# Altium PCB MainBoardPCB.PcbDoc (part 19 of 50)
Units mm, origin at the board's own origin, x right, y up, seen from the top; angles counter-clockwise.
Board outline 258.95 x 308.86 mm, 16 copper layers (L1, L2 (GND), L3 (Sign), L4 (GND), L5 (Sign), L6 (PWR/GND), L7(12V+Other), L8 (Plane_GND), L9 (PWR/GND), L10 (3V3+Other), L11 (PWR/GND), L12 (Sign), L13 (GND), L14 (Sign), L15 (GND), L16), stack 2.503 mm thick; 2578 components, 1867 nets, 8817 pads, 8021 vias.
Unrouted connection lines stored in the file: 25.
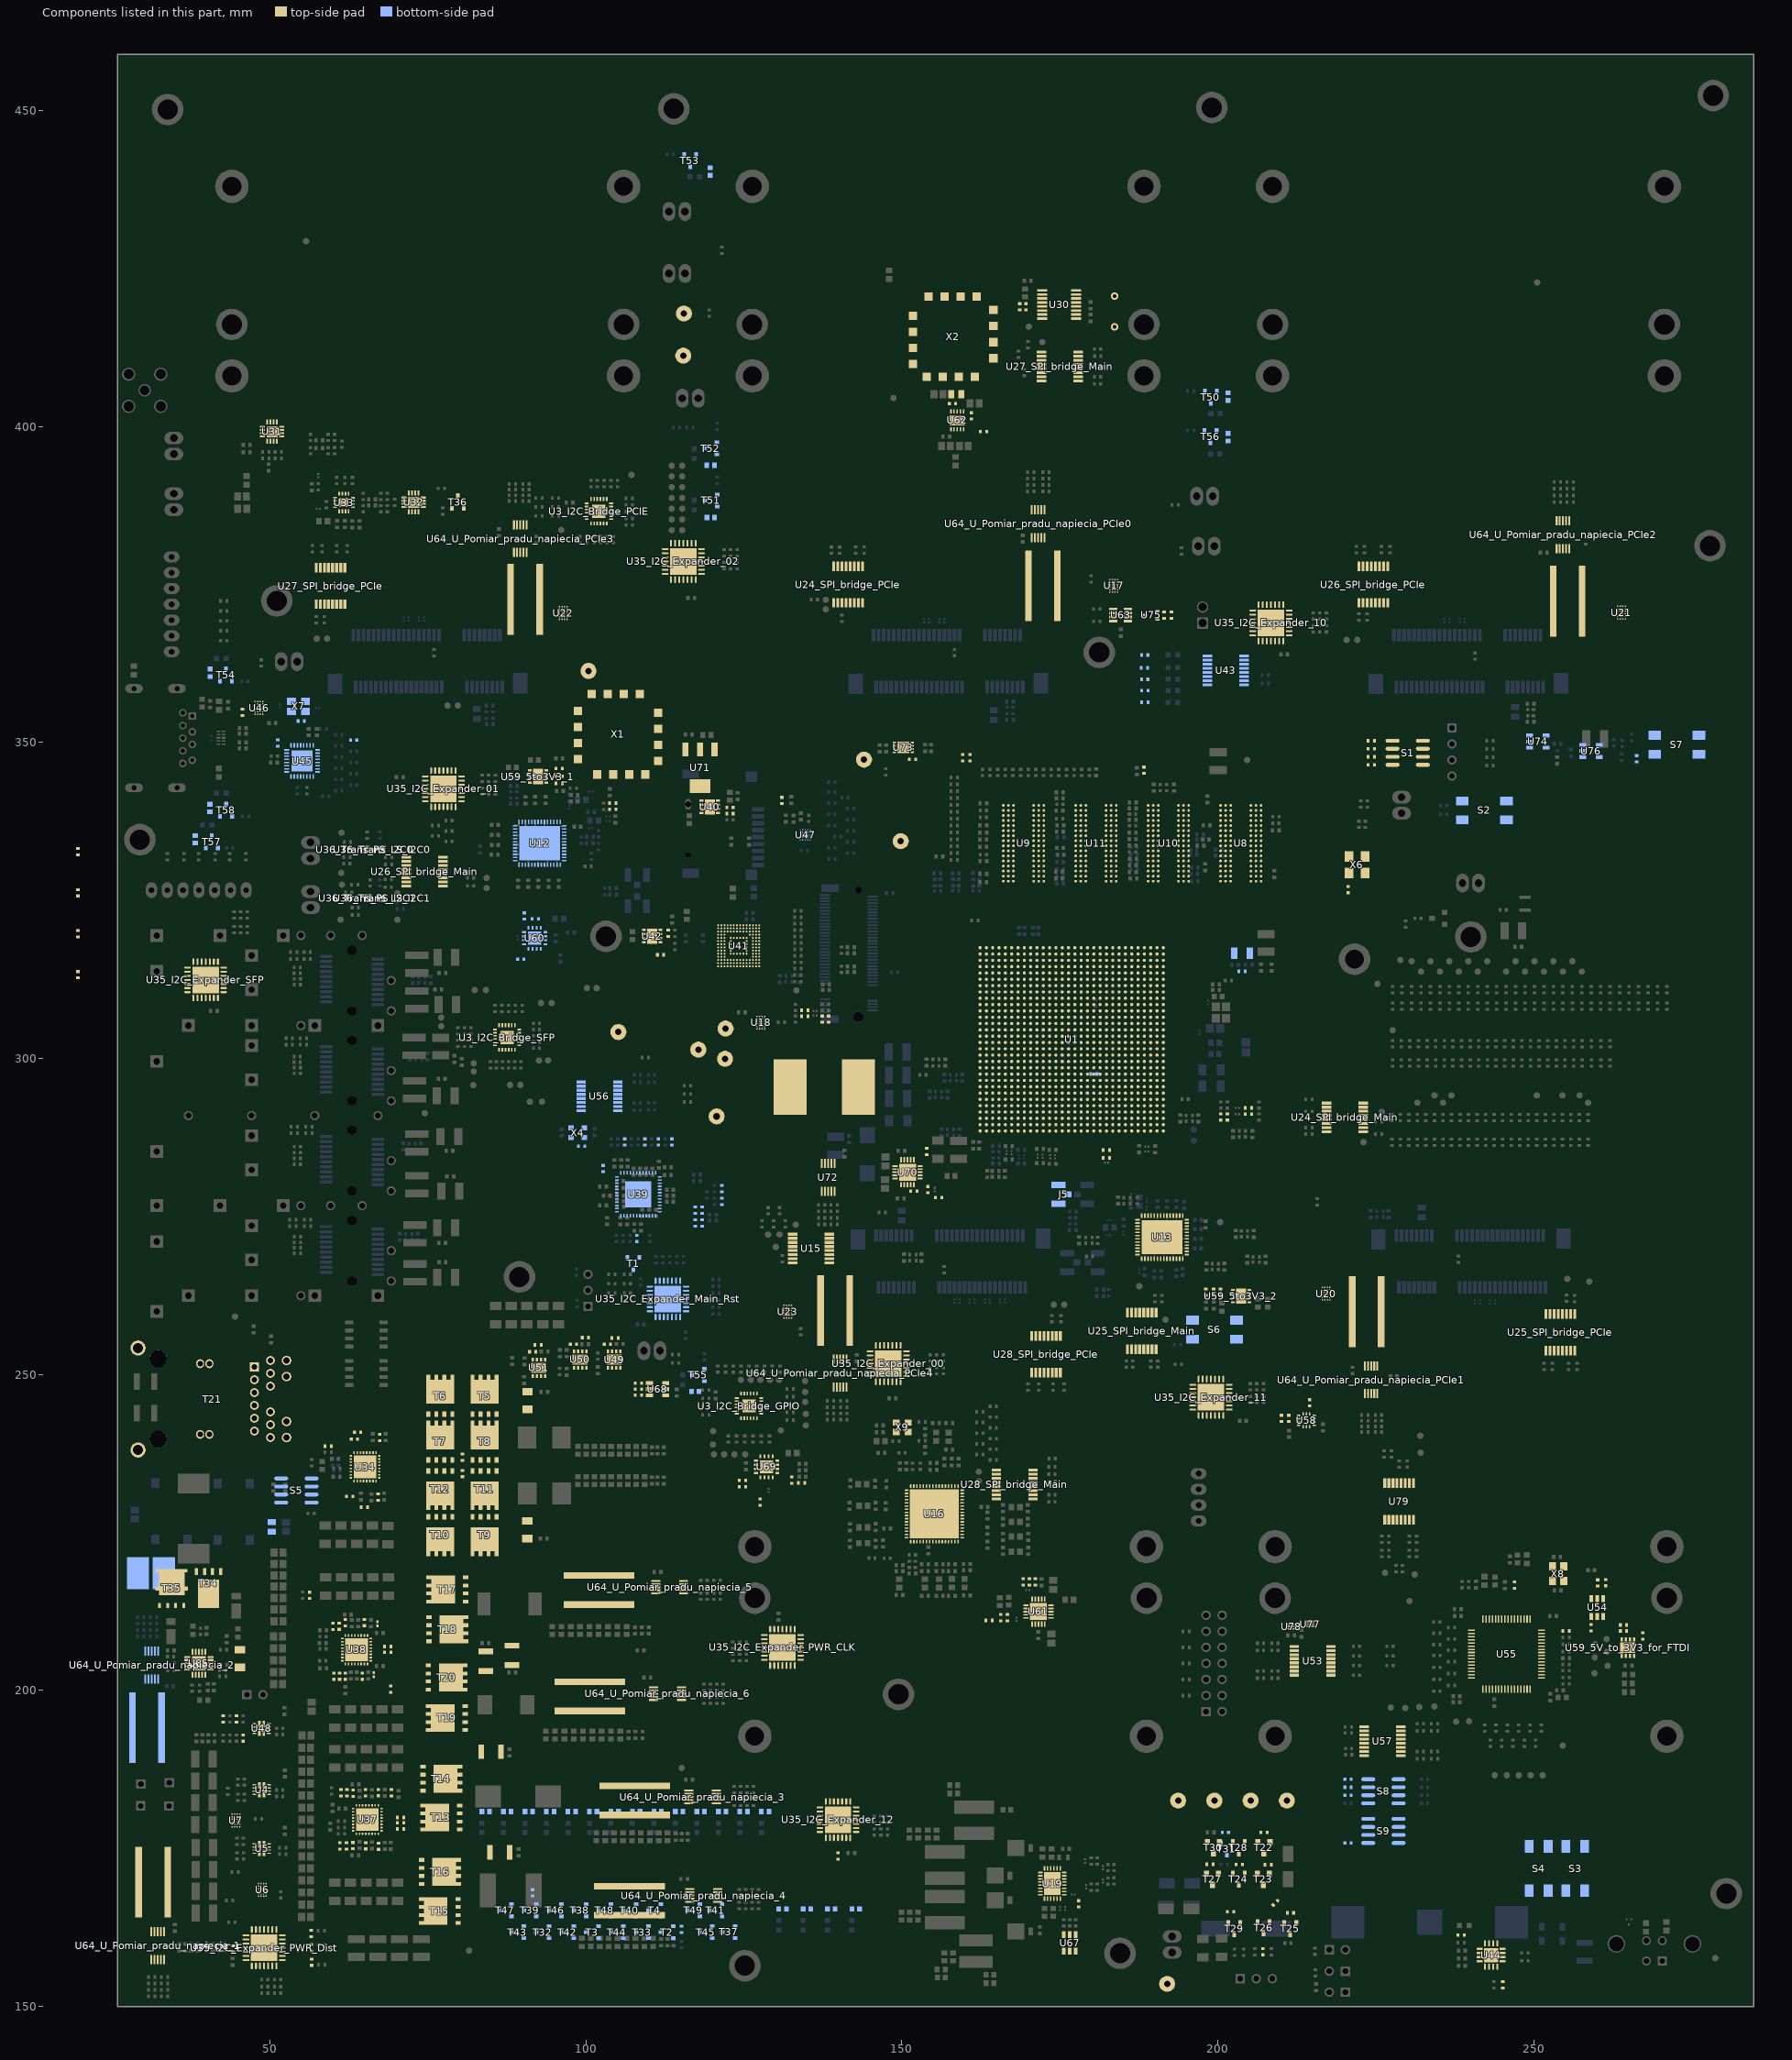
[diagram p23: the components of this part, seen from the top]

## Part data (continued)
U60 U69: "IC REG LIN POS ADJ 2A 16LFCSP", Case/Package="LFCSP EP", Dropout Voltage=160mV, Manufacturer="Analog Devices", Max Input Voltage=3.6V, Max Operating Temperature=125°C, Max Output Current=2A, Max Output Voltage=3V, Max Supply Current=1.8mA, Min Current Limit=2.4A, Min Input Voltage=1.6V, Min Operating Temperature=-40°C, Min Output Voltage=750mV, Output Voltage Accuracy=1%, Power Supply Rejection Ratio (PSRR)=70dB, Supplier Part Number 1=ADP1741ACPZ-R7CT-ND, Accuracy=1%, ComponentLink1Description=https://datasheet.ciiva.com/2041/adp1740-1741-2041344.pdf?src-supplier=Digi-Key, ComponentLink1URL=https://datasheet.ciiva.com/2041/adp1740-1741-2041344.pdf?src-supplier=Digi-Key, ComponentLink2Description=https://datasheet.ciiva.com/15364/adp1740-1741-259394-15364336.pdf?src-supplier=Mouser, ComponentLink2URL=https://datasheet.ciiva.com/15364/adp1740-1741-259394-15364336.pdf?src-supplier=Mouser, ComponentLink3Description=https://datasheet.ciiva.com/23604/697190-23604608.pdf?src-supplier=Newark, ComponentLink3URL=https://datasheet.ciiva.com/23604/697190-23604608.pdf?src-supplier=Newark, ComponentLink4Description=https://datasheet.ciiva.com/2041/adp1740-1741-2041345.pdf?src-supplier=Digi-Key, ComponentLink4URL=https://datasheet.ciiva.com/2041/adp1740-1741-2041345.pdf?src-supplier=Digi-Key, ComponentLink5Description=https://datasheet.ciiva.com/3224/adp1740-1741-3224694.pdf?src-supplier=Avnet, ComponentLink5URL=https://datasheet.ciiva.com/3224/adp1740-1741-3224694.pdf?src-supplier=Avnet, ComponentLink6Description=https://datasheet.ciiva.com/17365/adp1740-1741-17365261.pdf?src-supplier=Avnet+Europe, ComponentLink6URL=https://datasheet.ciiva.com/17365/adp1740-1741-17365261.pdf?src-supplier=Avnet+Europe, ComponentLink7Description=https://datasheet.ciiva.com/2041/adp1740-1741-2041343.pdf?src-supplier=Digi-Key, ComponentLink7URL=https://datasheet.ciiva.com/2041/adp1740-1741-2041343.pdf?src-supplier=Digi-Key, Lead Free="Contains Lead", Manufacturer Part Number=ADP1741ACPZ-R7, Number of Outputs=1, Number of Pins=16, Number of Regulators=1, Operating Supply Current=1.8mA, Output Current=2A, Output Type=Adjustable, Output Voltage=3V, Packaging="Tape and Reel", Polarity=Positive, Pricing 1="1 = 3,42000, 10 = 3,07000, 25 = 2,90240, 100 = 2,51540, 250 = 2,38644, 500 = 2,14136 (USD)", Radiation Hardening=No, REACH SVHC="No SVHC", RoHS=Yes, Stock 1=7057, Supplier 1=Digi-Key
U61 U70: "IC REG LINEAR POS ADJ 1A 20QFN", Case/Package=QFN, Dropout Voltage=130mV, Manufacturer="Texas Instruments", Max Operating Temperature=125°C, Min Current Limit=1.5A, Min Operating Temperature=-40°C, Output Current=1A, Output Voltage=5V, Quiescent Current=2mA, Supplier Part Number 1=296-43312-1-ND, Category="Voltage References", ComponentLink1Description=http://www.ti.com/lit/gpn/tps7a88?src-supplier=Mouser, ComponentLink1URL=http://www.ti.com/lit/gpn/tps7a88?src-supplier=Mouser, ComponentLink2Description=http://www.ti.com/lit/ds/symlink/tps7a88.pdf?src-supplier=Digi-Key, ComponentLink2URL=http://www.ti.com/lit/ds/symlink/tps7a88.pdf?src-supplier=Digi-Key, ComponentLink3Description=http://www.ti.com/general/docs/lit/getliterature.tsp?genericPartNumber=TPS7A88&amp;&amp;fileType=pdf&src-supplier=Farnell, ComponentLink3URL=http://www.ti.com/general/docs/lit/getliterature.tsp?genericPartNumber=TPS7A88&amp;&amp;fileType=pdf&src-supplier=Farnell, Lead Free="Lead Free", Manufacturer Part Number=TPS7A8801RTJT, Mount="Surface Mount", Number of Outputs=2, Number of Pins=20, Number of Regulators=2, Packaging="Tape and Reel", Pricing 1="1=2,77000, 10=2,48700, 25=2,34600, 100=1,87670 (USD)", RoHS=Yes, Stock 1=1455, Supplier 1=Digi-Key
U62: "LINEAR TECHNOLOGY         LT3042EDD#PBF             LDO Voltage Regulator, Adjustable, 1.8V to 20V in, 350mV drop, 0V to 15V/0.2A out, DFN-10", Case/Package=DFN, Dropout Voltage=350mV, Manufacturer="Analog Devices / Linear Technology", Max Input Voltage=20V, Max Operating Temperature=125°C, Max Output Voltage=15V, Min Current Limit=220mA, Min Input Voltage=1.8V, Min Operating Temperature=-40°C, Min Output Voltage=0uV, Output Current=200mA, Supplier Part Number 1=LT3042EDD#PBF-ND, Category="Voltage Regulators - Linear", ComponentLink1Description=http://www.farnell.com/datasheets/1941078.pdf?src-supplier=Farnell, ComponentLink1URL=http://www.farnell.com/datasheets/1941078.pdf?src-supplier=Farnell, ComponentLink2Description=http://www.linear.com/docs/55649?src-supplier=Digi-Key, ComponentLink2URL=http://www.linear.com/docs/55649?src-supplier=Digi-Key, ComponentLink3Description=http://www.farnell.com/datasheets/1941078.pdf?src-supplier=Element14, ComponentLink3URL=http://www.farnell.com/datasheets/1941078.pdf?src-supplier=Element14, Manufacturer Part Number=LT3042EDD#PBF, Mount="Surface Mount", Number of Pins=10, Number of Regulators=1, Output Type=Adjustable, Output Voltage=15V, Packaging=Rail/Tube, Pricing 1="1=5,46000, 25=3,62360, 100=2,99600 (USD)", REACH SVHC="No SVHC", RoHS=Yes, Stock 1=15977, Supplier 1=Digi-Key
U63: "IC TXRX CAN 1MBPS SOT23-8", Case/Package=SOT-23-8, Manufacturer=Maxim, Max Operating Temperature=85°C, Max Supply Current=70mA, Max Supply Voltage=3.465V, Min Operating Temperature=-40°C, Min Supply Voltage=3.135V, Operating Supply Current=35mA, Operating Supply Voltage=3.3V, Package Quantity=1, Supplier Part Number 1=MAX3051EKA+TCT-ND, Category="Interface ICs", ComponentLink1Description=https://datasheet.ciiva.com/1711/max3051-1711845.pdf?src-supplier=Digi-Key, ComponentLink1URL=https://datasheet.ciiva.com/1711/max3051-1711845.pdf?src-supplier=Digi-Key, ComponentLink2Description=https://datasheet.ciiva.com/1711/max3051-1711846.pdf?src-supplier=Digi-Key, ComponentLink2URL=https://datasheet.ciiva.com/1711/max3051-1711846.pdf?src-supplier=Digi-Key, ComponentLink3Description=https://datasheet.ciiva.com/1711/max3051-1711847.pdf?src-supplier=Digi-Key, ComponentLink3URL=https://datasheet.ciiva.com/1711/max3051-1711847.pdf?src-supplier=Digi-Key, ComponentLink4Description=https://datasheet.ciiva.com/16639/max3051-16639464.pdf?src-supplier=Avnet+Europe, ComponentLink4URL=https://datasheet.ciiva.com/16639/max3051-16639464.pdf?src-supplier=Avnet+Europe, ComponentLink5Description=https://datasheet.ciiva.com/12072/max3051-74908-12072588.pdf?src-supplier=Mouser, ComponentLink5URL=https://datasheet.ciiva.com/12072/max3051-74908-12072588.pdf?src-supplier=Mouser, Contact Plating=Tin,Matte, Data Rate=1Mbps, Height=1.25mm, Interface=CAN, Length=2.9mm, Manufacturer Part Number=MAX3051EKA+T, Mount="Surface Mount", Number of Pins=8, Number of Receive Buffers=1, Number of Transceivers=1, Number of Transmit Buffers=1, Packaging="Tape and Reel", Pricing 1="1=2,27000, 10=2,04000, 25=1,92800, 100=1,58540, 250=1,58208 (USD)", Radiation Hardening=No, REACH SVHC=Unknown, RoHS=Yes, Stock 1=2708, Supplier 1=Digi-Key, Weight=0.01787oz, Width=1.625mm
U64_U_Pomiar_pradu_napiecia_1 U64_U_Pomiar_pradu_napiecia_2 U64_U_Pomiar_pradu_napiecia_3 U64_U_Pomiar_pradu_napiecia_4 U64_U_Pomiar_pradu_napiecia_5 U64_U_Pomiar_pradu_napiecia_6 U64_U_Pomiar_pradu_napiecia_PCIe0 U64_U_Pomiar_pradu_napiecia_PCIe1 U64_U_Pomiar_pradu_napiecia_PCIe2 U64_U_Pomiar_pradu_napiecia_PCIe3 U64_U_Pomiar_pradu_napiecia_PCIe4 U72: "IC MONITOR PWR/CURR BIDIR 10MSOP", Case/Package=VSSOP, Input Bias Current=10uA, Input Offset Voltage (Vos)=2.5uV, Manufacturer="Texas Instruments", Max Operating Temperature=125°C, Max Supply Voltage=5.5V, Min Operating Temperature=-40°C, Min Supply Voltage=2.7V, Nominal Supply Current=330uA, Output Current=10mA, Package Quantity=1, Supplier Part Number 1=296-29034-1-ND, Accuracy=0.02%, Common Mode Rejection Ratio=140dB, ComponentLink1Description=https://datasheet.ciiva.com/1939/ina226-1939633.pdf?src-supplier=Digi-Key, ComponentLink1URL=https://datasheet.ciiva.com/1939/ina226-1939633.pdf?src-supplier=Digi-Key, ComponentLink2Description=https://datasheet.ciiva.com/4875/sbos547-126280-4875559.pdf?src-supplier=Mouser, ComponentLink2URL=https://datasheet.ciiva.com/4875/sbos547-126280-4875559.pdf?src-supplier=Mouser, ComponentLink3Description=https://datasheet.ciiva.com/1939/ina226-1939634.pdf?src-supplier=Digi-Key, ComponentLink3URL=https://datasheet.ciiva.com/1939/ina226-1939634.pdf?src-supplier=Digi-Key, ComponentLink4Description=https://datasheet.ciiva.com/1939/ina226-1939635.pdf?src-supplier=Digi-Key, ComponentLink4URL=https://datasheet.ciiva.com/1939/ina226-1939635.pdf?src-supplier=Digi-Key, ComponentLink5Description=https://datasheet.ciiva.com/14196/ina226-14196741.pdf?src-supplier=Avnet, ComponentLink5URL=https://datasheet.ciiva.com/14196/ina226-14196741.pdf?src-supplier=Avnet, ComponentLink6Description=https://datasheet.ciiva.com/22693/1840205-22693516.pdf?src-supplier=Element14, ComponentLink6URL=https://datasheet.ciiva.com/22693/1840205-22693516.pdf?src-supplier=Element14, Contact Plating=Gold, Lead Free="Lead Free", Manufacturer Part Number=INA226AIDGSR, Mount="Surface Mount", Number of Pins=10, Packaging="Tape and Reel", Pricing 1="1 = 2,88000, 10 = 2,58900, 100 = 2,12100, 500 = 1,80554, 1000 = 1,52275 (USD)", Radiation Hardening=No, REACH SVHC="No SVHC", RoHS=Yes, Stock 1=62024, Supplier 1=Digi-Key
U65: "IC REG CTRLR BUCK 20-TQFN", Manufacturer=Maxim, Supplier Part Number 1=MAX17557ATP+-ND, ComponentLink1Description=https://datasheets.maximintegrated.com/en/ds/MAX17557.pdf?src-supplier=Digi-Key, ComponentLink1URL=https://datasheets.maximintegrated.com/en/ds/MAX17557.pdf?src-supplier=Digi-Key, Manufacturer Part Number=MAX17557ATP+, Pricing 1="1 = 3,92000, 10 = 3,52200, 25 = 3,33000, 100 = 2,73800, 250 = 2,45680, 500 = 2,36800, 1000 = 2,22000 (USD)", RoHS=No, Stock 1=460, Supplier 1=Digi-Key
U67 U68: "IC PWR SUPPLY SEQUENCER SOT23-6", Case/Package=SOT-23-6, Manufacturer="TI National Semiconductor", Max Operating Temperature=125°C, Max Supply Voltage=5.5V, Min Operating Temperature=-40°C, Min Supply Voltage=2.7V, Number of Voltages Monitored=3, Operating Supply Current=25uA, Overvoltage Threshold=1.4V, Package Quantity=250, Supplier Part Number 1=LM3880MFE-1AF/NOPBCT-ND, Undervoltage Threshold=1V, ComponentLink1Description=https://datasheet.ciiva.com/14811/snvs451i-14811203.pdf?src-supplier=Arrow, ComponentLink1URL=https://datasheet.ciiva.com/14811/snvs451i-14811203.pdf?src-supplier=Arrow, ComponentLink2Description=https://datasheet.ciiva.com/15105/getdatasheetpartid-633699-15105702.pdf?src-supplier=Verical, ComponentLink2URL=https://datasheet.ciiva.com/15105/getdatasheetpartid-633699-15105702.pdf?src-supplier=Verical, ComponentLink3Description=https://datasheet.ciiva.com/3231/lm3880-3231307.pdf?src-supplier=Avnet, ComponentLink3URL=https://datasheet.ciiva.com/3231/lm3880-3231307.pdf?src-supplier=Avnet, ComponentLink4Description=https://datasheet.ciiva.com/6598/lm3880-6598591.pdf?src-supplier=Digi-Key, ComponentLink4URL=https://datasheet.ciiva.com/6598/lm3880-6598591.pdf?src-supplier=Digi-Key, Lead Free="Lead Free", Manufacturer Part Number=LM3880MFE-1AF/NOPB, Mount="Surface Mount", Number of Pins=6, Packaging="Tape and Reel", Pricing 1="1 = 1,55000, 10 = 1,38600, 25 = 1,31520, 100 = 1,00980 (USD)", Quiescent Current=25uA, RoHS=Yes, Stock 1=1640, Supplier 1=Digi-Key, Watchdog Timer=No
U71: "IC REG LINEAR 8V 500MA SOT223-4", Case/Package=SOT-223-4, Dropout Voltage=2V, Manufacturer="Texas Instruments", Max Input Voltage=25V, Max Operating Temperature=125°C, Max Output Current=500mA, Min Input Voltage=10.5V, Min Operating Temperature=-40°C, Nominal Output Voltage=8V, Package Quantity=1, Power Supply Rejection Ratio (PSRR)=80dB, Quiescent Current=4.6mA, Supplier Part Number 1=296-12612-1-ND, Category="Voltage Regulators - Linear", ComponentLink1Description=https://datasheet.ciiva.com/2042/ua78m05-2042195.pdf?src-supplier=Digi-Key, ComponentLink1URL=https://datasheet.ciiva.com/2042/ua78m05-2042195.pdf?src-supplier=Digi-Key, ComponentLink2Description=https://datasheet.ciiva.com/2042/ua78m05-2042196.pdf?src-supplier=Digi-Key, ComponentLink2URL=https://datasheet.ciiva.com/2042/ua78m05-2042196.pdf?src-supplier=Digi-Key, ComponentLink3Description=https://datasheet.ciiva.com/2042/ua78m05-2042197.pdf?src-supplier=Digi-Key, ComponentLink3URL=https://datasheet.ciiva.com/2042/ua78m05-2042197.pdf?src-supplier=Digi-Key, ComponentLink4Description=https://datasheet.ciiva.com/7992/1882046-7992585.pdf?src-supplier=Element14, ComponentLink4URL=https://datasheet.ciiva.com/7992/1882046-7992585.pdf?src-supplier=Element14, Lead Free="Lead Free", Manufacturer Part Number=UA78M08CDCYR, Mount="Surface Mount", Number of Outputs=1, Number of Pins=4, Number of Regulators=1, Output Current=500mA, Output Type=Fixed, Output Voltage=8V, Packaging="Tape and Reel", Polarity=Positive, Pricing 1="1=0,60000, 10=0,52700, 25=0,49480, 100=0,37520, 250=0,31932, 500=0,30334, 1000=0,23149 (USD)", Radiation Hardening=No, REACH SVHC="No SVHC", RoHS=Yes, Stock 1=16238, Supplier 1=Digi-Key
U73: "IC REG LINEAR POS ADJ 800MA 8DFN", Case/Package=DFN, Dropout Voltage=700mV, Input Bias Current=150uA, Manufacturer=STMicroelectronics, Max Input Voltage=5.5V, Max Operating Temperature=125°C, Max Output Current=800mA, Min Input Voltage=1V, Min Operating Temperature=-40°C, Operating Supply Current=200nA, Output Voltage=4V, Package Quantity=2500, Power Supply Rejection Ratio (PSRR)=80dB, Supplier Part Number 1=497-15098-1-ND, Tolerance=2%, Accuracy=2%, ComponentLink1Description=https://datasheet.ciiva.com/48677/dm00123507-48677501.pdf?src-supplier=Avnet, ComponentLink1URL=https://datasheet.ciiva.com/48677/dm00123507-48677501.pdf?src-supplier=Avnet, Height=0.9mm, Lead Free="Lead Free", Length=2mm, Manufacturer Part Number=ST1L08SPUR, Mount="Surface Mount", Number of Outputs=1, Number of Pins=8, Number of Regulators=1, Output Current=800mA, Output Type=Adjustable, Packaging="Tape and Reel", Polarity=Positive, Pricing 1="1 = 0,72000, 10 = 0,63200, 25 = 0,59400, 100 = 0,45020, 250 = 0,38316, 500 = 0,36400, 1000 = 0,27779 (USD)", Quiescent Current=150uA, Radiation Hardening=No, RoHS=Yes, Stock 1=4850, Supplier 1=Digi-Key, Width=3mm
U74 U76: "IC GATE AND 1CH 2-INP SOT23-5", Case/Package=SOT-23, High Level Output Current=-32mA, Low Level Output Current=32mA, Manufacturer="Texas Instruments", Max Operating Temperature=125°C, Max Supply Voltage=5.5V, Min Operating Temperature=-40°C, Min Supply Voltage=1.65V, Package Quantity=1, Quiescent Current=10uA, Supplier Part Number 1=296-11601-1-ND, ComponentLink1Description=https://datasheet.ciiva.com/27049/756490-27049780.pdf?src-supplier=Jameco, ComponentLink1URL=https://datasheet.ciiva.com/27049/756490-27049780.pdf?src-supplier=Jameco, ComponentLink2Description=https://datasheet.ciiva.com/26048/sn74lvc1g08-26048421.pdf?src-supplier=Avnet+Europe, ComponentLink2URL=https://datasheet.ciiva.com/26048/sn74lvc1g08-26048421.pdf?src-supplier=Avnet+Europe, ComponentLink3Description=https://datasheet.ciiva.com/16503/sn74lvc1g08-16503398.pdf?src-supplier=Avnet+Asia, ComponentLink3URL=https://datasheet.ciiva.com/16503/sn74lvc1g08-16503398.pdf?src-supplier=Avnet+Asia, ComponentLink4Description=https://datasheet.ciiva.com/46439/1834190-46439158.pdf?src-supplier=Element14, ComponentLink4URL=https://datasheet.ciiva.com/46439/1834190-46439158.pdf?src-supplier=Element14, ComponentLink5Description=https://datasheet.ciiva.com/1864/sn74lvc1g08-1864152.pdf?src-supplier=Digi-Key, ComponentLink5URL=https://datasheet.ciiva.com/1864/sn74lvc1g08-1864152.pdf?src-supplier=Digi-Key, ComponentLink6Description=https://datasheet.ciiva.com/28540/1772545-28540795.pdf?src-supplier=Element14, ComponentLink6URL=https://datasheet.ciiva.com/28540/1772545-28540795.pdf?src-supplier=Element14, ComponentLink7Description=https://datasheet.ciiva.com/1864/sn74lvc1g08-1864153.pdf?src-supplier=Digi-Key, ComponentLink7URL=https://datasheet.ciiva.com/1864/sn74lvc1g08-1864153.pdf?src-supplier=Digi-Key, Contact Plating=Gold, Lead Free="Lead Free", Logic Function=AND, Manufacturer Part Number=SN74LVC1G08DBVR, Max Output Current=32mA, Mount="Surface Mount", Number of Bits=1, Number of Circuits=1, Number of Elements=1, Number of Gates=1, Number of Input Lines=2, Number of Inputs=2, Number of Output Lines=1, Number of Outputs=1, Number of Pins=5, Output Current=32mA, Packaging="Tape and Reel", Pricing 1="1 = 0,27000, 10 = 0,22100, 25 = 0,18560, 100 = 0,11740, 250 = 0,09064, 500 = 0,07726, 1000 = 0,05253 (USD)", Propagation Delay=4ns, Radiation Hardening=No, REACH SVHC="No SVHC", RoHS=Yes, Stock 1=64376, Supplier 1=Digi-Key, Termination=SMD/SMT, Turn-On Delay Time=4.5ns, Weight=0.000557oz
U75: "TVS DIODE 26.5VWM 44VC SOT323", Case/Package=SOT-323-3, Clamping Voltage=44V, Manufacturer=STMicroelectronics, Max Operating Temperature=175°C, Min Breakdown Voltage=28.5V, Min Operating Temperature=-55°C, Peak Pulse Current=3A, Peak Pulse Power=250W, Power Line Protection=No, Reverse Standoff Voltage=26.5V, Supplier Part Number 1=497-15845-1-ND, ComponentLink1Description=http://www.mouser.com/ds/2/389/esdcan02-2bwy-954689.pdf?src-supplier=Mouser, ComponentLink1URL=http://www.mouser.com/ds/2/389/esdcan02-2bwy-954689.pdf?src-supplier=Mouser, ComponentLink2Description=https://www.st.com/resource/en/datasheet/esdcan06-2bwy.pdf?src-supplier=Digi-Key, ComponentLink2URL=https://www.st.com/resource/en/datasheet/esdcan06-2bwy.pdf?src-supplier=Digi-Key, ComponentLink3Description=http://www.st.com/content/ccc/resource/sales_and_marketing/promotional_material/selection_guide/fa/8a/bd/fb/a8/06/42/00/sgdiodeauto.pdf/files/sgdiodeauto.pdf/jcr:content/translations/en.sgdiodeauto.pdf?src-supplier=Digi-Key, ComponentLink3URL=http://www.st.com/content/ccc/resource/sales_and_marketing/promotional_material/selection_guide/fa/8a/bd/fb/a8/06/42/00/sgdiodeauto.pdf/files/sgdiodeauto.pdf/jcr:content/translations/en.sgdiodeauto.pdf?src-supplier=Digi-Key, Composition=Zener, Manufacturer Part Number=ESDCAN02-2BWY, Mount="Surface Mount", Number of Bidirectional Channels=2, Packaging="Cut Tape", Pricing 1="1 = 0,43000, 10 = 0,32700, 25 = 0,29440, 100 = 0,15530, 250 = 0,15372, 500 = 0,13764, 1000 = 0,10712 (USD)", RoHS=Yes, Stock 1=3018, Supplier 1=Digi-Key
U77 U78: "Buffer/Driver 2-CH Non-Inverting Open Drain CMOS 6-Pin MicroPak T/R", Low Level Output Current=32mA, Manufacturer="ON Semiconductor / Fairchild", Max Operating Temperature=85°C, Max Supply Voltage=5.5V, Min Operating Temperature=-40°C, Min Supply Voltage=1.65V, Package Quantity=5000, Quiescent Current=1uA, Supplier Part Number 1=NC7WZ07FHXCT-ND, Category="Buffers, Drivers and Transceivers", ComponentLink1Description=http://components.arrow.com/part/dataview/50566895S8849776N7769?src-supplier=Arrow, ComponentLink1URL=http://components.arrow.com/part/dataview/50566895S8849776N7769?src-supplier=Arrow, ComponentLink2Description=http://www.mouser.com/ds/2/149/NC7WZ07-116137.pdf?src-supplier=Mouser, ComponentLink2URL=http://www.mouser.com/ds/2/149/NC7WZ07-116137.pdf?src-supplier=Mouser, ComponentLink3Description=http://uk.rs-online.com/webdocs/12cf/0900766b812cff2b.pdf?src-supplier=RSComponents, ComponentLink3URL=http://uk.rs-online.com/webdocs/12cf/0900766b812cff2b.pdf?src-supplier=RSComponents, ComponentLink4Description=http://components.arrow.com/part/dataview/0323_03242749?src-supplier=Arrow+Europe, ComponentLink4URL=http://components.arrow.com/part/dataview/0323_03242749?src-supplier=Arrow+Europe, ComponentLink5Description=http://www.produktinfo.conrad.com/datenblaetter/1200000-1299999/001253547-da-01-en-IC_BUFFER_UHS_DUA_NC7WZ07FHX_UFDFN_6_FSC.pdf?src-supplier=Conrad, ComponentLink5URL=http://www.produktinfo.conrad.com/datenblaetter/1200000-1299999/001253547-da-01-en-IC_BUFFER_UHS_DUA_NC7WZ07FHX_UFDFN_6_FSC.pdf?src-supplier=Conrad, ComponentLink6Description=https://www.fairchildsemi.com/datasheets/NC/NC7WZ07.pdf?src-supplier=Avnet, ComponentLink6URL=https://www.fairchildsemi.com/datasheets/NC/NC7WZ07.pdf?src-supplier=Avnet, ComponentLink7Description=http://www.fairchildsemi.com/datasheets/NC/NC7WZ07.pdf?src-supplier=Digi-Key, ComponentLink7URL=http://www.fairchildsemi.com/datasheets/NC/NC7WZ07.pdf?src-supplier=Digi-Key, ComponentLink8Description=https://www.fairchildsemi.com/datasheets/NC/NC7WZ07.pdf?src-supplier=Digi-Key, ComponentLink8URL=https://www.fairchildsemi.com/datasheets/NC/NC7WZ07.pdf?src-supplier=Digi-Key, ComponentLink9Description=https://www.onsemi.com/pub/Collateral/NC7WZ07-D.pdf?src-supplier=Digi-Key, ComponentLink9URL=https://www.onsemi.com/pub/Collateral/NC7WZ07-D.pdf?src-supplier=Digi-Key, Height=0.55mm, Length=1mm, Logic Function=Buffer,Inverting, Manufacturer Part Number=NC7WZ07FHX, Mount="Surface Mount", Number of Bits per Element=1, Number of Channels=2, Number of Elements=2, Number of Input Lines=2, Number of Inputs=2, Number of Output Lines=2, Number of Outputs=2, Number of Pins=6, Packaging="Tape and Reel", Polarity=Non-Inverting, Pricing 1="1=0,62000, 10=0,53300, 100=0,39800, 500=0,31270, 1000=0,24164 (USD)", Propagation Delay=12.6ns, RoHS=Yes, Schmitt Trigger Input=No, Stock 1=3074, Supplier 1=Digi-Key, Turn-On Delay Time=12.6ns, Weight=0.02g, Width=1mm
X1: library part CVCO55CC-2000-2000, Frequency=2GHz, Load Capacitance=22pF, Manufacturer=Crystek, Max Operating Temperature=85°C, Min Operating Temperature=-30°C, Operating Supply Voltage=8V, Package Quantity=1, Supplier Part Number 1=549-CVCO55CC20002000, ComponentLink1Description=https://datasheet.ciiva.com/12380/cvco55cc-2000-2000-218619-12380053.pdf?src-supplier=Mouser, ComponentLink1URL=https://datasheet.ciiva.com/12380/cvco55cc-2000-2000-218619-12380053.pdf?src-supplier=Mouser, ComponentLink2Description=https://datasheet.ciiva.com/6719/cvco55cc-2000-2000-6719815.pdf?src-supplier=Digi-Key, ComponentLink2URL=https://datasheet.ciiva.com/6719/cvco55cc-2000-2000-6719815.pdf?src-supplier=Digi-Key, Height=0.22inch, Length=0.5inch, Manufacturer Part Number=CVCO55CC-2000-2000, Packaging="Cut Tape", Pricing 1="1 = 32,65000, 5 = 31,16000, 10 = 28,20000, 25 = 26,71000, 50 = 25,23000, 100 = 22,26000 (USD)", RoHS=Yes, Stock 1=18, Supplier 1=Mouser, Termination=SMD/SMT, Width=0.5inch
X2: library part CVCO55CL-0490-0540, Case/Package=SMD/SMT, Frequency=540MHz, Load Capacitance=100pF, Manufacturer=Crystek, Max Operating Temperature=85°C, Max Supply Voltage=5.25V, Min Operating Temperature=-40°C, Min Supply Voltage=4.75V, Package Quantity=5, Supplier Part Number 1=744-1174-ND, ComponentLink1Description=https://datasheet.ciiva.com/884/cvco55cl-0490-0540-884171.pdf?src-supplier=Digi-Key, ComponentLink1URL=https://datasheet.ciiva.com/884/cvco55cl-0490-0540-884171.pdf?src-supplier=Digi-Key, ComponentLink2Description=https://datasheet.ciiva.com/12381/cvco55cl-0490-0540-32994-12381581.pdf?src-supplier=Mouser, ComponentLink2URL=https://datasheet.ciiva.com/12381/cvco55cl-0490-0540-32994-12381581.pdf?src-supplier=Mouser, ComponentLink3Description=https://datasheet.ciiva.com/14620/70051761-14620845.pdf?src-supplier=Allied+Electronics, ComponentLink3URL=https://datasheet.ciiva.com/14620/70051761-14620845.pdf?src-supplier=Allied+Electronics, Height=0.15inch, Length=0.5inch, Manufacturer Part Number=CVCO55CL-0490-0540, Mount="Surface Mount", Number of Pins=16, Packaging="Cut Tape", Pricing 1="1 = 24,31000, 5 = 23,20600, 10 = 20,99500, 25 = 19,89000, 50 = 18,78500 (USD)", RoHS=Yes, Stock 1=6, Supplier 1=Digi-Key, Termination=SMD/SMT, Width=0.5inch
X3: library part MP024S, "CRYSTAL 2.4576MHZ 32PF T/H", ESR (Equivalent Series Resistance)=300R, Frequency Stability=50ppm, Frequency Tolerance=30ppm, Load Capacitance=32pF, Manufacturer=CTS, Max Operating Temperature=70°C, Min Operating Temperature=-20°C, Package Quantity=100, Supplier Part Number 1=CTX069-ND, ComponentLink1Description=https://datasheet.ciiva.com/27056/2039161-27056418.pdf?src-supplier=Jameco, ComponentLink1URL=https://datasheet.ciiva.com/27056/2039161-27056418.pdf?src-supplier=Jameco, ComponentLink2Description=https://datasheet.ciiva.com/15116/getdatasheetpartid-123295-15116382.pdf?src-supplier=Verical, ComponentLink2URL=https://datasheet.ciiva.com/15116/getdatasheetpartid-123295-15116382.pdf?src-supplier=Verical, ComponentLink3Description=https://datasheet.ciiva.com/854/008-0308-0-854108.pdf?src-supplier=Digi-Key, ComponentLink3URL=https://datasheet.ciiva.com/854/008-0308-0-854108.pdf?src-supplier=Digi-Key, Depth=3.8mm, Frequency=2.4576MHz, Height=0.53inch, Lead Free="Lead Free", Length=10.85mm, Manufacturer Part Number=MP024S, Mount="Through Hole", Number of Pins=2, Packaging=Bulk, Pricing 1="1 = 1,14000, 10 = 1,08500, 50 = 1,05980, 100 = 0,90850, 500 = 0,88322, 1000 = 0,74443, 2500 = 0,70658, 5000 = 0,68135, 10000 = 0,65611 (USD)", Radiation Hardening=No, RoHS=Yes, Series Resistance=300R, Stock 1=2166, Supplier 1=Digi-Key, Termination=Radial, Tolerance=30ppm, Width=0.15inch
X4: "CRYSTAL 25.0000MHZ 18PF SMD", Case/Package=SMD/SMT, ESR (Equivalent Series Resistance)=50R, Frequency=25MHz, Frequency Stability=30ppm, Frequency Tolerance=50ppm, Load Capacitance=18pF, Manufacturer 1=Epson, Max Operating Temperature=70°C, Min Operating Temperature=-20°C, Package Quantity=250, Supplier Part Number 1=SER3691CT-ND, ComponentLink1Description=http://www.mouser.com/ds/2/137/A-238_en-932914.pdf?src-supplier=Mouser, ComponentLink1URL=http://www.mouser.com/ds/2/137/A-238_en-932914.pdf?src-supplier=Mouser, ComponentLink2Description=https://www5.epsondevice.com/en/information/support/pdf/june_2018_psc_masterbook.pdf?src-supplier=Digi-Key, ComponentLink2URL=https://www5.epsondevice.com/en/information/support/pdf/june_2018_psc_masterbook.pdf?src-supplier=Digi-Key, Height=0.028inch, Lead Free="Lead Free", Length=0.126inch, Manufacturer Part Number 1=FA-23825.0000MB-C3, Mount="Surface Mount", Packaging="Tape and Reel", Pricing 1="1=0,36000, 10=0,30300, 50=0,27220, 100=0,24200 (USD)", RoHS=Yes, Stock 1=39779, Supplier 1=Digi-Key, Termination=SMD/SMT, Tolerance=50ppm, Weight=0.000564oz, Width=0.098inch
X5: library part FC-13532.7680KA-A5, "CRYSTAL 32.7680 KHZ 12.5PF SMD", Case/Package=SMD/SMT, ESR (Equivalent Series Resistance)=70kR, Frequency Tolerance=20ppm, Load Capacitance=12.5pF, Manufacturer=Epson, Max Operating Temperature=85°C, Min Operating Temperature=-40°C, Supplier Part Number 1=SER4103CT-ND, Category=Crystals, ComponentLink1Description=https://support.epson.biz/td/api/doc_check.php?dl=brief_FC-135&lang=en&src-supplier=Digi-Key, ComponentLink1URL=https://support.epson.biz/td/api/doc_check.php?dl=brief_FC-135&lang=en&src-supplier=Digi-Key, ComponentLink2Description=https://www.eea.epson.com/wp-content/uploads/2016/11/November-2016-PCS-MASTER-BOOK.pdf?src-supplier=Digi-Key, ComponentLink2URL=https://www.eea.epson.com/wp-content/uploads/2016/11/November-2016-PCS-MASTER-BOOK.pdf?src-supplier=Digi-Key, Frequency=32.768kHz, Height=0.035inch, Length=0.126inch, Manufacturer Part Number=FC-13532.7680KA-A5, Mount="Surface Mount", Number of Pins=2, Packaging="Tape and Reel", Pricing 1="1=0,43000, 10=0,35800, 50=0,32180, 100=0,28600, 500=0,27170, 1000=0,22880 (USD)", Pricing 2="1=0,64000, 10=0,53600, 50=0,48260, 100=0,42900, 500=0,40756 (USD)", RoHS=Yes, Series Resistance=70kR, Stock 1=101729, Stock 2=1608, Supplier 1=Digi-Key, Supplier 2=Digi-Key, Supplier Part Number 2=2195-CC7V-T1A-32.768KHZ-12.5PF-20PPM-TA-QCCT-ND, Width=0.061inch
X6: "SMD Crystal Oscillator 50MHz 3.3V 4-Pin SMD Tray", Case/Package=SMD/SMT, Frequency=50MHz, Frequency Stability=20ppm, Manufacturer="Silicon Labs", Operating Supply Voltage=3.3V, Package Quantity=1, Supplier Part Number 1=336-5245-ND, ComponentLink1Description=https://datasheet.ciiva.com/9292/+si510-11-9292588.pdf?src-supplier=Avnet, ComponentLink1URL=https://datasheet.ciiva.com/9292/+si510-11-9292588.pdf?src-supplier=Avnet, Length=5mm, Manufacturer Part Number=510CCA50M0000BAG, Packaging=Tray, Pricing 1="1 = 3,26000, 25 = 3,13800, 100 = 3,01710, 1000 = 2,62163 (USD)", RoHS=Yes, Stock 1=247, Supplier 1=Digi-Key, Weight=0.001764oz, Width=3.2mm
X7: "CRYSTAL 24.00 MHZ 9.0PF SMD", Case/Package=SMD/SMT, ESR (Equivalent Series Resistance)=40R, Frequency=24MHz, Frequency Stability=15ppm, Frequency Tolerance=10ppm, Load Capacitance=9pF, Manufacturer 1=Epson, Max Operating Temperature=85°C, Min Operating Temperature=-40°C, Supplier Part Number 1=SER4180DKR-ND, ComponentLink1Description=https://www5.epsondevice.com/en/information/support/pdf/june_2018_psc_masterbook.pdf?src-supplier=Digi-Key, ComponentLink1URL=https://www5.epsondevice.com/en/information/support/pdf/june_2018_psc_masterbook.pdf?src-supplier=Digi-Key, Height=0.024inch, Lead Free="Lead Free", Length=0.126inch, Manufacturer Part Number 1=TSX-322524.0000MF15X-AC6, Mount="Surface Mount", Packaging="Tape and Reel", Pricing 1="1=0,36000, 10=0,30300, 50=0,27220, 100=0,24200, 500=0,22990, 1000=0,19360 (USD)", RoHS=Yes, Stock 1=33708, Supplier 1=Digi-Key, Width=0.098inch
X8: Manufacturer 1="ECS International", Supplier Part Number 1=XC2904CT-ND, Manufacturer Part Number 1=ECS-120-8-33-RWY-TR, Pricing 1="1=0,56000, 10=0,46500, 50=0,41820, 100=0,37180, 500=0,35322 (USD)", RoHS=No, Stock 1=526, Supplier 1=Digi-Key
X9: "OSC MEMS 48.0000MHZ LVCMOS SMD", Case/Package=SMD/SMT, Frequency=48MHz, Frequency Stability=25ppm, Manufacturer=SiTime, Max Operating Temperature=85°C, Max Supply Current=4.5mA, Min Operating Temperature=-40°C, Supplier Part Number 1=1473-30890-1-ND, Category=Oscillators, ComponentLink1Description=https://www.sitime.com/products/datasheets/sit1602/SiT1602B-datasheet.pdf?src-supplier=Digi-Key, ComponentLink1URL=https://www.sitime.com/products/datasheets/sit1602/SiT1602B-datasheet.pdf?src-supplier=Digi-Key, Height=0.032inch, Length=0.098inch, Manufacturer Part Number=SIT1602BI-12-33E-48.000000G, Mount="Surface Mount", Packaging="Tape and Reel", Pricing 1="1=1,36000, 10=1,30100, 50=1,27060, 100=1,08900 (USD)", RoHS=Yes, Stock 1=283, Supplier 1=Digi-Key, Width=0.079inch
P7 P8 P9 P10: LatestRevisionDate=17-Jul-2002, LatestRevisionNote="Re-released for DXP Platform.", Publisher="Altium Limited"